# Altium PCB PCB_GTV3.5.PcbDoc (part 9 of 11)
Units mil, origin at the board's own origin, x right, y up, seen from the top; angles counter-clockwise.
Board outline 8070.87 x 4881.89 mil, 4 copper layers (Top Layer, GND, PWR, Bottom Layer), stack 61.653 mil thick; 490 components, 296 nets, 1533 pads, 845 vias.
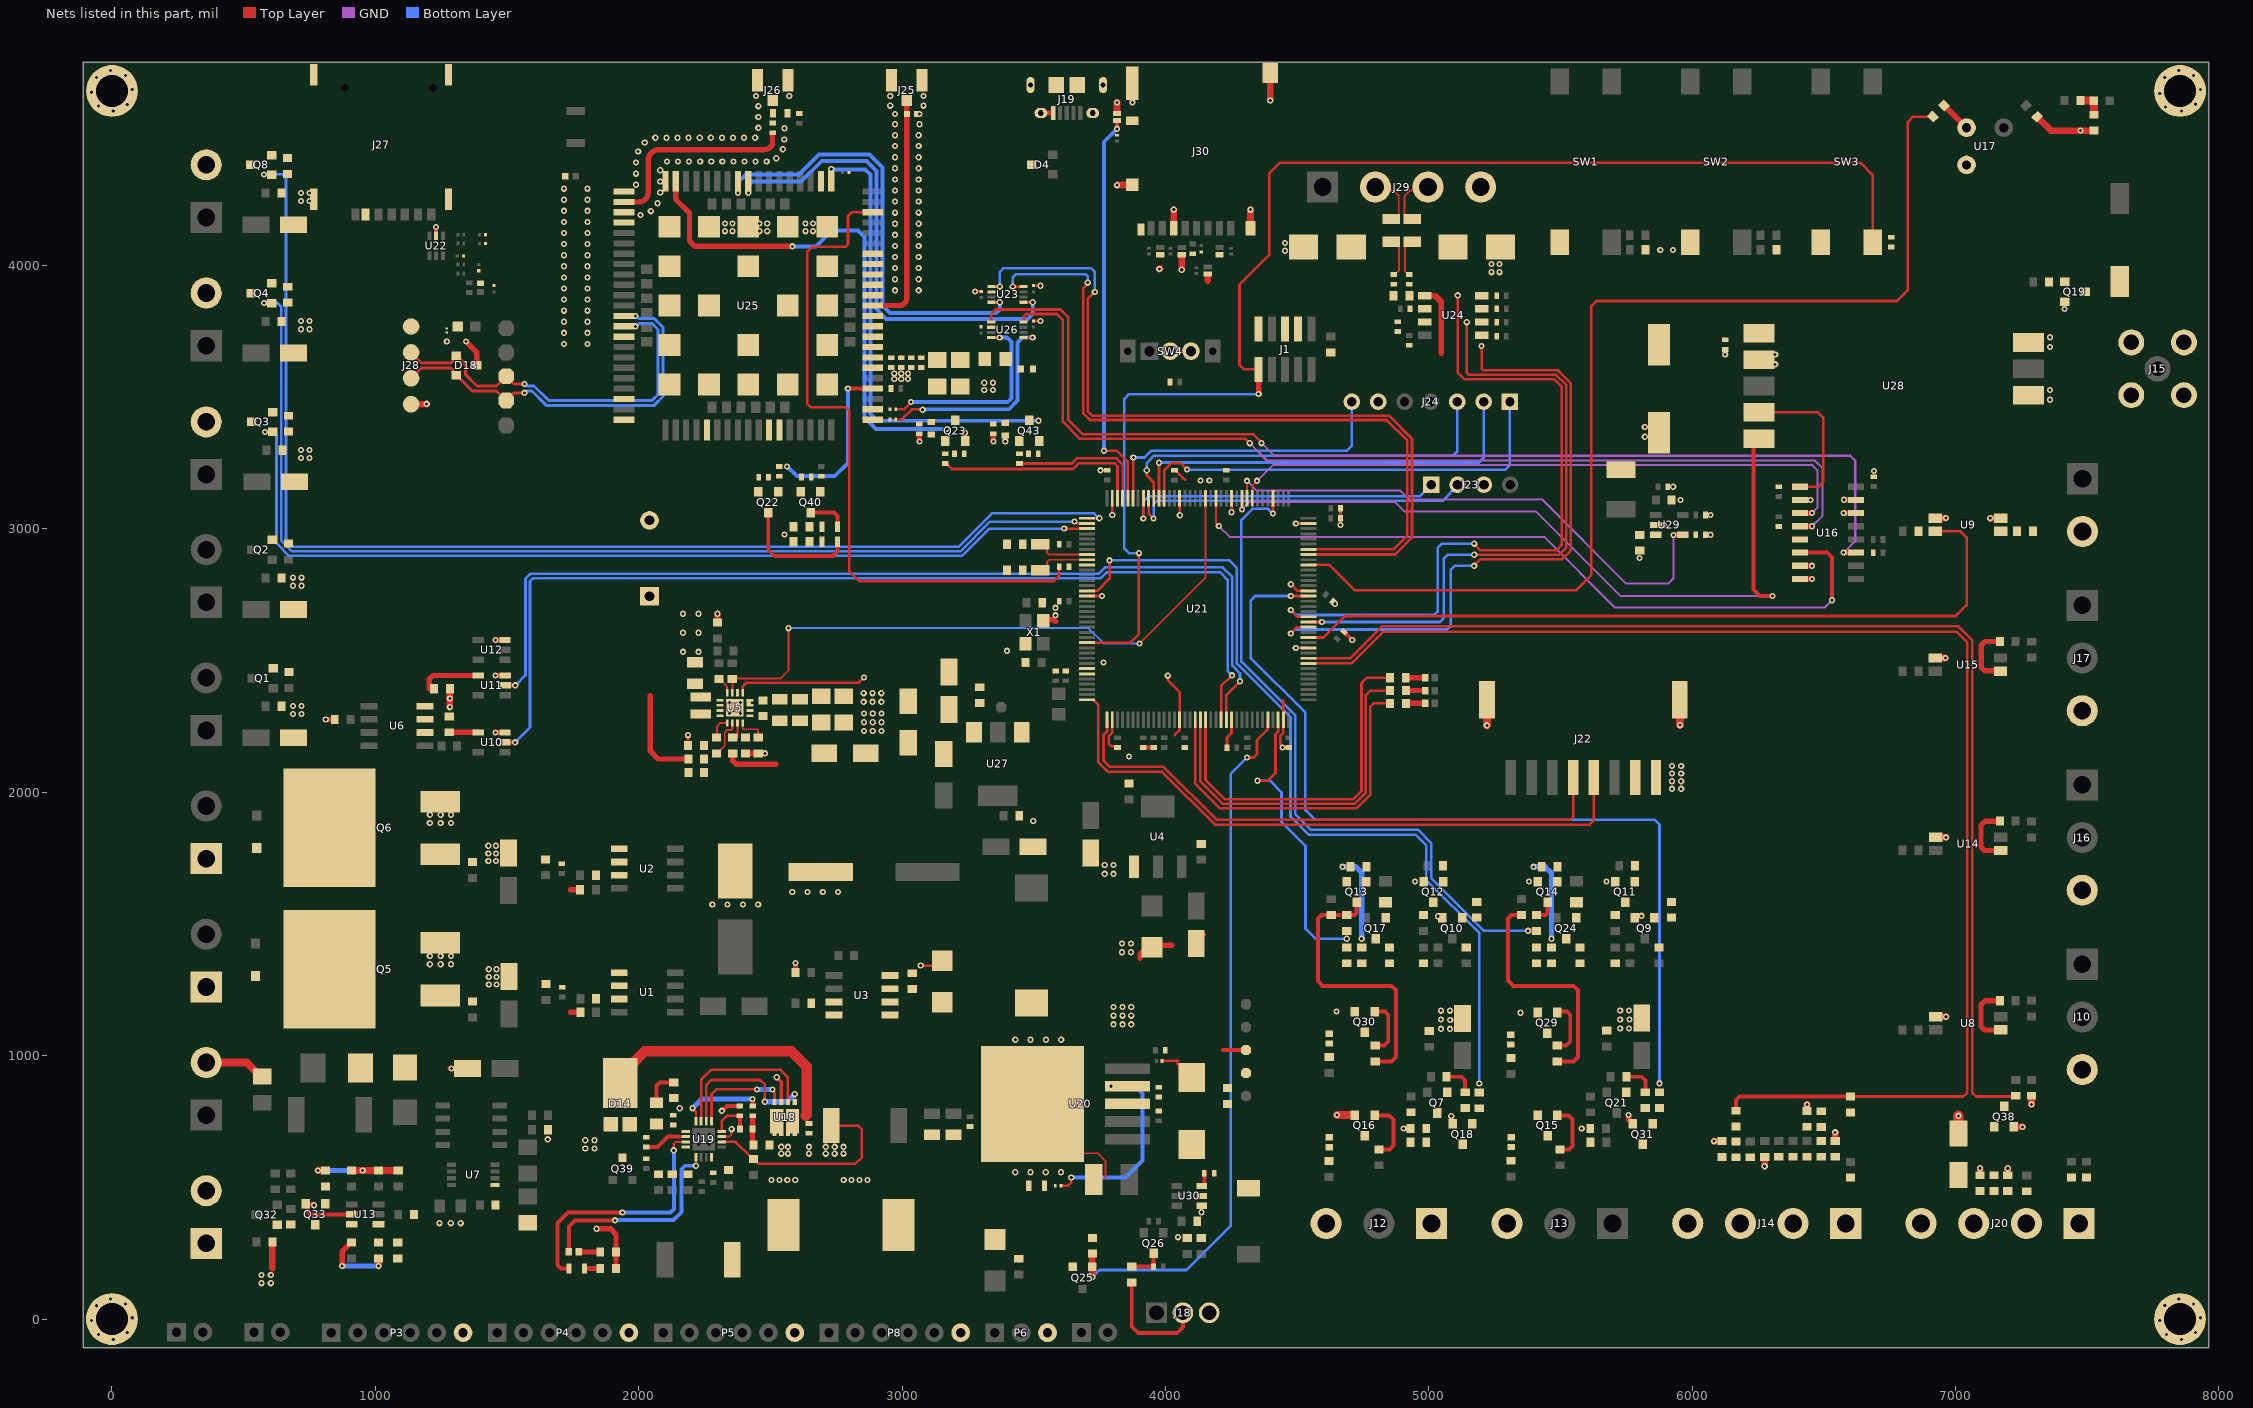
[diagram p6: the nets of this part, all layers, seen from the top]

## Via types
v1: diameter 23.62, hole 11.81, Top Layer to Bottom Layer, tented both sides, 444 vias
v2: diameter 23.62, hole 11.81, Top Layer to Bottom Layer, 401 vias

## Nets (pads, with @x,y where several pads share a name; then routed paths per layer and width w, separated by ;. In a path a pad name is that pad's centre, name@x,y a point inside that pad or via, vN(x,y) a via of type N, cw(c..) or ccw(c..) an arc to the next point about the centre after c; other vN are vias at no path point) (continued)
GATE_DRV.INA_1: U10.2 U21.59 | length 3903.6
  Top Layer w10: U21.59@4211.45,2275.56 4211.45,2402.99 v1(4252.67,2444.21)
  Top Layer w15: U10.2@1492.46,2189.85 v2(1530.87,2189.85)
  Bottom Layer w10: v2@1531.02,2189.74 1587.15,2245.87 1587.15,2801.51 1597.79,2812.15 3754,2812.15 3777.85,2836 4206.4,2836 4235.95,2806.45 4235.95,2460.93 v1(4252.67,2444.21)
GATE_DRV.INB_1: U11.2 U21.60 | length 3751.2
  Top Layer w10: U21.60@4231.14,2275.56 4231.14,2369.29 v1@4283.01,2421.16
  Top Layer w15: U11.2@1492.87,2406.21 v2(1531.28,2406.21)
  Bottom Layer w10: v2@1531.43,2406.09 1570.15,2444.82 1570.15,2811.38 1588.22,2829.44 3745.84,2829.44 3770.4,2854 4217.39,2854 4253.95,2817.45 4253.95,2480.85 4283.01,2451.79 v1(4283.01,2421.64)
GND: C1.2 C2.1 C3.2 C4.2 C5.1 C6.2 C7.2 C8.1 C9.2 C10.2 C11.2 C12.2 C13.1 C14.1 C15.1 C16.2 C17.2 C18.2 C19.2 C20.1 C21.2 C22.2 C23.2 C24.2 C25.2 C26.2 C27.2 C28.1 C29.2 C30.2 C31.2 C32.2 C33.2 C34.1 C35.1 C36.2 C37.1 C38.1 C39.2 C40.2 C41.1 C42.2 C43.2 C44.1 C45.2 C46.2 C47.2 C48.2 C49.2 C50.2 C51.2 C52.2 C53.1 C54.2 C55.2 C57.1 C58.2 C59.2 C60.1 C61.2 C62.2 C63.2 C64.2 C65.2 C66.2 C67.2 C68.2 C69.2 C70.2 C71.1 C72.1 C73.1 C74.1 C76.2 C77.1 C78.1 C79.1 C80.2 C81.1 C83.1 C84.1 C85.1 C88.1 C89.2 C90.1 C91.2 C92.1 C93.2 C94.2 C95.2 C97.1 C98.1 C99.1 C100.1 C101.2 C102.1 C103.2 C104.2 C105.2 C106.2 C107.1 C108.1 C109.2 C110.2 C111.2 C112.2 C113.2 C114.2 C122.1 C123.1 C124.2 C125.1 C126.2 C127.1 C128.1 C129.1 D1.2 D2.2 D3.1 D4.3 D5.1 D8.1 D9.1 D10.1 D12.2 D13.1 D16.2 D17.1 D18.3 D19.2 D20.1 D21.1 D22.1 D23.1 D24.1 D27.1 D30.2 J1.3 J1.5 J1.9 J2.2 J10.3 J12.3 J13.3 J14.3 J14.4 J15.2 J15.3 J15.4 J15.5 J16.3 J17.3 J18.3 J19.5 J19.MH1 J19.MH2 J19.MH3 J19.MH4 J19.MP1 J19.MP2 J20.4 J21.2 J22.1 J22.2 J22.MP1 J22.MP2 J23.3 J24.6 J25.2 J25.3 J26.2 J26.3 J27.1 J27.2 J27.3 J27.4 J27.C5 J28.4 J29.4 J30.6 J30.S1 J30.S2 J30.S3 J30.S4 J30.SW-B LED11.2 NT1.2 P3.6 P4.6 P5.6 P6.3 P8.6 P10.1 pad.MH1 Q1.2 Q2.2 Q3.2 Q4.2 Q5.2 Q6.2 Q8.2 Q9.2 Q10.2 Q11.2 Q12.2 Q13.2 Q14.2 Q15.2 Q16.2 Q18.2 Q19.2 Q22.2 Q23.2 Q25.2 Q29.2 Q30.2 Q31.2 Q33.2 Q38.2 Q40.2 Q43.2 R2.1 R4.2 R6.2 R7.2 R9.2 R10.2 R13.2 R26.2 R32.2 R34.2 R53.1 R54.1 R61.2 R65.1 R66.1 R67.2 R69.2 R70.2 R72.2 R83.2 R84.2 R86.1 R88.1 R91.1 R92.1 R97.2 R98.2 R103.2 R113.1 R131.1 R133.1 R139.1 R142.1 R147.1 R148.2 R155.1 R165.1 R166.1 R167.1 R170.1 SW1.1 SW2.1 SW3.1 SW4.3 U1.5 U1.6 U2.5 U2.6 U3.4 U4.1 U5.17 U6.3 U8.3 U9.2 U9.3 U10.3 U11.3 U12.3 U13.2 U14.3 U15.3 U16.2 U16.5 U16.7 U16.8 U16.14 U16.15 U17.3 U18.3 U19.11 U20.3 U20.6 U21.16 U21.30 U21.31 U21.38 U21.51 U21.61 U21.71 U21.83 U21.94 U21.107 U21.120 U21.130 U21.143 U22.2 U23.2 U24.5 U25.2 U25.17 U25.18 U25.29 U25.39 U25.45 U25.46 U25.54 U25.58 U25.59 U25.61 U25.62 U25.63 U25.64 U25.65 U25.69 U25.70 U25.71 U25.72 U25.73 U25.74 U25.75 U25.76 U25.77 U25.78 U25.79 U25.80 U25.81 U25.82 U25.83 U25.84 U25.85 U25.86 U25.87 U25.88 U25.89 U25.91 U25.92 U25.94 U26.2 U27.1 U28.2 U28.7 U28.8 U29.2 U30.4 X1.2 X1.4 | length 6088
  Top Layer w7: U20.6@3495.55,817.03 3683.05,629.53 3742.84,629.53 3773.26,599.11 3773.26,598.16 3772.8,597.7 3772.8,534.16
  Top Layer w8: U19.11@2315.54,692.67 2343.2,692.67 2352.87,702.34 v2(2352.87,721.03)
  Top Layer w10: J28.4@1135.6,3473.34 J28.4@1136.43,3474.17 ; v1@1194.17,3474.17 v1(1195,3475) ; U10.3@1492.46,2227.25 U10.3@1492.87,2227.66 ; U12.3@1492.46,2578.46 U12.3@1492.95,2578.95 ; U11.3@1492.87,2443.61 U11.3@1492.95,2443.68 ; C4.2@1505.16,1298.03 C4.2@1507.5,1300.37 ; C122.1@2187.33,2178 v2(2187.33,2216.99) ; U5.17@2344.33,2345.13 2344.33,2341.53 U5.17@2365.33,2320.53 ; C80.2@2383.71,808.69 C80.2@2383.87,808.53 ; C16.2@2594.98,1667.95 2624.43,1697.4 C16.2@2691.42,1697.4 ; v2(3070.87,1342.03) 3134.13,1342.03 D1.2@3152.87,1360.77 ; v1(3276.82,3901.99) C103.2@3300.41,3901.99 ; C106.2@3499,3789.81 3499.34,3789.47 3525.38,3789.47 v1(3525.72,3789.13) ; C104.2@3499,3923.81 v1@3525.03,3923.81 ; X1.4@3535.62,2650.61 X1.4@3537.32,2652.31 ; U21.16@3702.4,2745.25 v1(3759.39,2745.25) ; v1(3753.18,3222.5) C110.2@3778.38,3222.5 ; U21.38@3798.06,2275.56 3798.06,2226.29 3784.85,2213.07 3784.85,2184.03 3794.38,2174.5 3813.75,2174.5 C30.2@3817.75,2170.5 ; v1(3798.06,3053.42) U21.143@3798.06,3116.51 ; v1(4009.09,2442.9) 4009.17,2442.83 4009.17,2425.07 4053.97,2380.26 U21.51@4053.97,2275.56 4053.97,2236.81 4034.95,2217.79 ; J30.6@4031.27,4141 J30.6@4031.54,4140.73 ; C109.2@4034.28,3222.5 4038.28,3218.5 4042.61,3218.5 4074.63,3186.48 ; U21.130@4053.97,3116.51 4054.25,3116.23 4054.25,3052.41 v1(4054.53,3052.13) ; C29.2@4070.16,2170.5 C29.2@4073.66,2170.5 ; C95.2@4227.64,3222.5 C95.2@4231.14,3222.5 ; C12.2@4233.51,2169.01 4233.51,2207.34 4250.82,2224.66 U21.61@4250.82,2275.56 ; U21.120@4250.82,3116.51 4251.1,3116.23 v1(4251.1,3063.4) ; v1(4444.4,2170.5) 4444.4,2174.19 4436.04,2182.55 4436.04,2214.65 4447.67,2226.29 U21.71@4447.67,2275.56 4447.67,2349.65 ; v1(4476,2790.13) 4501.2,2764.93 U21.94@4543.34,2764.93 ; v1(4495,3020.84) U21.107@4543.34,3020.84 ; v1(4495.05,2548.4) U21.83@4543.34,2548.4 ; C33.2@4635.03,2724.72 C33.2@4635.03,2724.82 ; v1(4664.5,3015.33) C93.2@4664.5,3040.52 C112.2@4664.5,3079 ; C32.2@4677.63,2609.36 C32.2@4677.97,2609.36 ; Q16.2@4719.36,774.29 Q16.2@4719.47,774.4 ; C59.2@5001.64,1094.03 C59.2@5001.87,1094.26 ; J22.MP2@5220.24,2350.68 J22.MP2@5220.88,2351.31 ; D8.1@5248.34,4046.42 D8.1@5272.47,4070.55 ; SW1.1@5517,4088.44 SW1.1@5518.87,4086.57 ; C45.2@5674.87,1096.03 C45.2@5675.87,1095.03 ; SW3.1@6489.55,4088.44 SW3.1@6489.87,4088.12 ; D12.2@7010.76,704.89 D12.2@7010.87,704.77 ; C40.2@7092.99,546.03 C40.2@7092.99,546.03 ; R66.1@7197.88,546.15 R66.1@7197.99,546.03 ; Q38.2@7221.27,729.66 Q38.2@7221.38,729.78
  Top Layer w15: Q33.2@742.89,435.03 Q33.2@737.21,435.03 ; Q33.2@742.89,436.86 Q33.2@748.42,436.86 ; Q33.2@750.25,435.03 752.22,437 v2@766.67,437 ; U13.2@909.82,397.63 750.52,397.63 741.23,406.92 741.23,431.01 Q33.2@737.21,435.03 ; U22.2@1230.87,4113.22 v2(1230.87,4146.03) ; v2(2315.54,790.67) 2317.88,790.67 2335.74,808.53 2378.87,808.53 2379.03,808.69 C80.2@2383.71,808.69 ; v2(2524,918) 2541.16,900.84 U18.3@2541.16,824.67 ; C30.2@3817.75,2170.5 3819.25,2169 C30.2@3822.75,2169 ; v1@3860.35,2135.31 3862,2133.66 v1@3863.65,2135.31 ; C36.2@3912.67,2170.5 C36.2@3916.17,2170.5 R13.2@3955.54,2170.5 ; C21.2@4114.81,1399.48 4114.81,1428.16 C21.2@4146.68,1460.03 ; C33.2@4635.03,2724.72 4635.14,2724.72 v1(4643.87,2715.98) ; C32.2@4677.97,2609.36 4677.97,2609.16 4709.12,2578.01 v1(4709.25,2578.01) ; Q33.2@737.21,435.03 735.24,435.03 Q33.2@735.24,437 Q33.2@737.21,435.03
  Top Layer w20: v2(811.87,2276.03) C55.2@845.87,2276.03 ; v2@1283.91,951.4 v2(1288.91,951.4) C1.2@1350.25,951.4 ; v1(1344.37,3711.4) 1385.37,3670.39 D18.3@1385.37,3621 ; v2@1456.35,2227.18 U10.3@1492.39,2227.18 ; v2@1456.35,2578.39 U12.3@1492.39,2578.39 ; v2@1456.76,2443.53 U11.3@1492.8,2443.53 ; U12.3@1491.56,2580.27 1492.89,2578.95 U12.3@1492.95,2578.95 ; 1740.87,1630.29 C18.2@1777.5,1630.29 ; 1741.87,1165.29 C6.2@1778.5,1165.29 ; R2.1@2594.98,1315.4 v1(2594.98,1352.03) ; v1(3065.6,3332.27) C97.1@3065.6,3356.75 ; Q23.2@3239,3347.34 v1(3239,3365.2) ; v1(3346.6,3332.27) C102.1@3346.6,3356.75 ; v1(3391.54,3332.27) D19.2@3391.54,3350.13 ; J19.MH2@3526.96,4579.07 J19.5@3565.94,4579.07 ; X1.4@3537.32,2656.31 3572.56,2656.31 3580.46,2648.41 3582.78,2648.41 3583,2648.62 ; 3903.48,1370.11 3903.48,1386.35 3916.86,1399.73 3933.1,1399.73 3933.1,1406.03 3946.47,1419.41 4023.83,1419.41 ; v2(5085.18,770.31) 5085.88,769.61 5085.88,749.84 5090.47,745.25 Q18.2@5090.47,741.73 ; v2(5758.32,774.38) 5759.02,773.69 5759.02,759.14 5774.47,743.7 Q31.2@5774.47,741.73 ; U16.8@6408.7,2810 v1(6455,2810) ; U16.7@6408.7,2860 v1(6455,2860) ; U16.2@6408.7,3110 v1(6449.19,3110) ; v1(6575,3060) U16.14@6621.3,3060 ; v1(6576.47,3110.62) U16.15@6622.77,3110.62
  Top Layer w22: C123.1@2299.33,2644 v2(2299.33,2678) ; R165.1@2405.49,2147.99 v2(2479.7,2147.98) ; U24.5@4985.78,3884.35 U24.5@4984.62,3885.51 5024.34,3885.51 5046.87,3862.99 5046.87,3668.53
  Top Layer w25: R34.2@608.87,293.03 609.03,292.87 609.03,193.03 ; J28.4@1136.43,3474.17 v1@1194.17,3474.17 ; v2@1282.87,2327.21 v2(1282.87,2356.12) R84.2@1282.87,2393.03 ; v1(3816,4305.19) 3816.63,4305.81 J30.S2@3874.06,4305.81 ; D24.1@3816,4584.4 v1(3816,4619.29) ; v1@3874.32,4619.56 J30.S3@3874.32,4662.3 ; v1(3976.65,3986.97) v1@3980,3990.32 ; J30.6@4031.27,4141 v1(4031.27,4212.12) ; v1(4061.84,3983.97) D22.1@4061.84,4033.92 ; 4160.84,3942.3 D21.1@4160.84,3960.17 ; J30.S1@4322.88,4141.26 v1(4322.88,4212.12) ; v1(4397.68,4627) 4397.68,4672.74 J30.S4@4397.68,4730.74 ; v2(6082.87,675.4) C42.2@6112.87,675.4 ; v2(6275.03,580.03) R103.2@6275.03,615.4 ; C79.1@6435.87,790.03 v2(6435.87,815.03) ; R113.1@6542.76,676.51 v2(6542.76,709.05) ; U15.3@6922.43,2509.75 6922.54,2509.86 v2(6961.06,2509.86) ; U9.3@6923.21,3040.92 6923.32,3041.03 v2(6962.87,3041.03) ; U8.3@6924.21,1147.92 6924.32,1148.03 v2(6963.87,1148.03) ; U14.3@6924.21,1828.92 6924.32,1829.03 v2(6963.87,1829.03) ; C40.2@7092.99,546.03 v2(7092.95,572.76) ; v2(7131.59,3040.81) 7171.13,3040.81 U9.2@7171.25,3040.92 ; R66.1@7197.88,546.15 v2(7197.88,572.76) ; Q38.2@7221.38,729.78 v2(7253.92,729.78) ; v2(7288.34,815.38) C39.2@7288.34,847.92 ; C76.2@7309.39,4565.16 7362.02,4512.53 v1(7473.87,4512.53) R53.1@7525.38,4512.53
  Top Layer w30: J2.2@357.92,974.12 511.35,974.12 544.98,940.49 C2.1@544.98,939.51 ; v2(4650.87,774.4) 4719.24,774.4 Q16.2@4719.36,774.29 ; v1(5220.24,2254.36) J22.MP2@5220.24,2350.68 ; v1(5953.16,2254.99) J22.MP1@5953.16,2351.31
  Top Layer w40: D12.2@7010.76,704.89 v2(7010.76,771.69)
  Top Layer w50: P4.6@1961.87,-50.43 P4.6@1962.87,-51.43 ; P5.6@2592.62,-51.43 P5.6@2593.87,-50.18 ; P8.6@3222.37,-51.43 P8.6@3222.87,-50.93 ; P6.3@3551.87,-51.18 P6.3@3552.12,-51.43
  Bottom Layer w70: P6.3@3552.12,-51.43 P6.3@3552.29,-51.27
  other v1: 5045.87,1101.9 5079.87,1101.9 5726.37,1102.9 5760.37,1102.9 5045.87,1136.9 5726.37,1137.9 5045.87,1170.9 5079.87,1170.9 5726.37,1171.9 5760.37,1171.9 1207,1346.99 1248,1346.99 1287,1346.99 1207,1378.99 1248,1378.99 1287,1378.99 1207,1883 1248,1883 1287,1883 1207,1915 1248,1915 1287,1915 3862,2135.66 687.87,2297.07 720,2297.07 687.87,2328 720,2328 3765,2493 687.87,2784.11 720,2784.11 687.87,2815.03 720,2815.03 5800,2890 6069.1,2978.04 5892.75,3015.45 6069.1,3052.85 5955.75,3109.38 5927.75,3160 4132.71,3183.5 4166.57,3183.5 6690,3220 717.87,3269.11 750,3269.11 717.87,3300.03 750,3300.03 5820,3350 5820,3387.5 7358.31,3490.35 7358.31,3527.85 2970.31,3569.63 2996.8,3569.63 3022.8,3569.63 2970.31,3590.25 2996.8,3590.25 3022.8,3590.25 6315,3625 6125,3662.5 6315,3662.5 7358.31,3690.35 1715.89,3702.37 1805.85,3702.37 7358.31,3727.85 1715.89,3744.48 1805.85,3744.48 717.87,3758.07 750,3758.07 1715.89,3786.59 1805.85,3786.59 717.87,3789 750,3789 1715.89,3828.7 1805.85,3828.7 7413.69,3835 1715.89,3870.82 1805.85,3870.82 2973,3906 3063,3906 1715.89,3912.93 1805.85,3912.93 3525.38,3923.47 2973,3948.11 3063,3948.11 1715.89,3955.04 1805.85,3955.04 2973,3990.23 3063,3990.23 1715.89,3997.16 1805.85,3997.16 2973,4032.34 3063,4032.34 1715.89,4039.27 1805.85,4039.27 5879,4059 5927,4059 2973,4074.45 3063,4074.45 1715.89,4081.38 1805.85,4081.38 2973,4116.57 3063,4116.57 1715.89,4123.5 1805.85,4123.5 2973,4158.68 3063,4158.68 1715.89,4165.61 1805.85,4165.61 2007.04,4191.51 2973,4200.79 3063,4200.79 2046.08,4206.47 1715.89,4207.72 1805.85,4207.72 2071.23,4236.51 2973,4242.91 3063,4242.91 717.87,4245.07 750,4245.07 1715.89,4249.84 1805.85,4249.84 717.87,4276 750,4276 2081.74,4277.51 2973,4285.02 3063,4285.02 1715.89,4291.95 1805.85,4291.95 1990,4306.77 2081.74,4319.63 2973,4327.13 3063,4327.13 1990,4348.89 2081.74,4361.74 2973,4369.25 3063,4369.25 1990,4391 2106.91,4395.15 2149.03,4395.15 2191.14,4395.15 2233.25,4395.15 2275.37,4395.15 2317.48,4395.15 2359.59,4395.15 2401.71,4395.15 2443.82,4395.15 2485.93,4395.15 2522.07,4407.56 2973,4411.36 3063,4411.36 1998,4433.11 2547.22,4441.6 2973,4453.47 3063,4453.47 2023.15,4467.15 2552.67,4479.03 2063.19,4485.11 2105.3,4485.11 2147.41,4485.11 2189.53,4485.11 2231.64,4485.11 2273.75,4485.11 2315.87,4485.11 2357.98,4485.11 2400.09,4485.11 2442.21,4485.11 2973,4494.58 3063,4494.58 2553.67,4521.14 2454.11,4523 2973,4536.7 3066,4536.7 2454.11,4564.11 2973,4575 3066,4575 2454.11,4605.23 2954.91,4607.11 3081.05,4607.11 3874.59,4619.29 2445.45,4644.09 2571.59,4644.09 2954.91,4644.09 3081.05,4644.09
  other v2: 5,-77.16 7857.27,-77.1 -50.91,-58.15 7801.36,-58.09 57.98,-51.08 7910.25,-51.01 -77,-5.16 7775.27,-5.1 77,4.84 7929.27,4.9 -57.98,50.75 7794.29,50.81 50.91,57.82 7903.18,57.88 -5,76.84 7847.27,76.9 568.2,136.36 603.2,136.36 568.2,167.36 603.2,167.36 4047.67,311 1243.98,364.16 1286.39,364.16 1323.98,364.16 4137.05,405.52 766.67,432 3429.52,557.6 3487.52,557.6 3545.52,557.6 3603.52,557.6 2646.47,628 2646.47,654 1654.87,682.4 4904.52,723.51 5580.21,723.51 2155.89,800.39 3429.97,1060.42 3487.97,1060.42 3545.97,1060.42 3603.97,1060.42 5080.87,1135.9 5761.37,1136.9 5348,1163 4649.2,1167.51 1430.95,1270.14 1459.79,1270.14 1430.95,1299.07 1459.79,1299.07 1430.95,1328 1459.79,1328 3835.37,1392.58 3868.87,1392.58 3835.37,1425.58 3868.87,1425.58 5035.03,1529.4 5807.7,1531.06 2279.58,1573.6 2337.58,1573.6 2395.58,1573.6 2453.58,1573.6 2583,1622 2641,1622 2699,1622 2757,1622 4947.18,1661.06 5380.55,1661.06 5674.81,1661.06 3769.62,1690.56 3803.12,1690.56 3769.62,1723.56 3803.12,1723.56 1429,1739.14 1457.83,1739.14 1429,1768.07 1457.83,1768.07 1429,1797 1457.83,1797 3497.87,1891 5923.17,2013.18 5958,2013.18 5923.17,2042.11 5958,2042.11 5923.17,2071.03 5958,2071.03 5923.17,2099.96 5958,2099.96 1456.28,2227.1 2344.72,2299.53 2385.93,2299.53 1282.87,2323.21 2344.33,2341.13 2385.93,2341.53 1456.69,2443.46 3398.84,2537.19 1456.28,2578.32 3583,2672.02 3583,2700.37 1271.6,3711.4 5237.87,3974.83 5267.87,3974.83 5237.87,4006.03 5267.87,4006.03 4454.07,4056.03 4454.07,4086.03 2327.52,4130.49 2356.36,4130.49 2459.13,4130.49 2487.96,4130.49 2632.77,4130.49 2661.6,4130.49 2327.52,4159.42 2356.36,4159.42 2459.13,4159.42 2487.96,4159.42 2632.77,4159.42 2661.6,4159.42 4.94,4586.13 7857.21,4586.19 7797.3,4602.21 -50.97,4605.15 57.92,4612.22 7910.19,4612.28 7775.24,4653.79 -77.06,4658.13 76.94,4668.13 7929.21,4668.19 -58.04,4714.04 7794.23,4714.1 50.85,4721.11 7903.12,4721.17 -5.06,4740.13 7847.21,4740.19
GND_DRV_1: D25.1 J3.1 Q5.3
GND_DRV_2: D26.1 J4.1 Q6.3
GNSS_ANT: C96.2 J26.1 L6.2 | length 0
GNSS_MCU_RX: R169.1 U16.4 U26.8 | length 3809.8
  Top Layer w10: U26.8@3460.89,3785.56 3460.89,3786.05 3461.3,3786.47 3461.3,3806.47 3470.78,3815.94 3587.29,3815.94 3610.09,3793.15 3610.09,3408.07 3675.78,3342.39 4303.18,3342.39 v2(4320,3325.57)
  Top Layer w20: U16.4@6408.7,3010 v1(6455,3010)
  GND w8: v2(4320,3325.57) 4385.57,3260 6465,3260 6495,3230 6495,3050 v1(6455,3010)
GNSS_MCU_TX: R104.1 U16.11 U26.1 | length 4198.2
  Top Layer w10: U26.1@3338.84,3785.56 3338.84,3815.53 3356.26,3832.94 3601.68,3832.94 3631.58,3803.04 3631.58,3413.87 3686.06,3359.39 4333.75,3359.39 4365,3328.14 v2(4365,3325.57)
  Top Layer w20: v1(6575,2910) U16.11@6621.3,2910
  GND w8: v2(4365,3325.57) 4412.57,3278 6600.25,3278 6619.03,3259.23 6619.03,2954.03 v1(6575,2910)
GNSS_PWRCTRL: R134.2 U21.10
GNSS_RXD: R135.2 U26.4 | length 754.3
  Top Layer w10: R135.2@2975.69,3454.33 3007.45,3454.33 3033.84,3480.72 v1(3033.84,3481.89) ; U26.4@3338.84,3726.51 v1(3370.59,3726.51)
  Bottom Layer w15: v1(3033.84,3481.89) 3401.22,3481.89 3415.29,3495.97 3415.29,3709.15 3397.93,3726.51 v1(3370.59,3726.51)
GNSS_TXD: R140.2 U26.5 | length 814.4
  Top Layer w10: R140.2@2975.69,3414.96 2997.56,3414.96 3036.93,3454.33 3076.35,3454.33 v1(3078.1,3452.58) ; U26.5@3460.89,3726.51 v1(3495.78,3726.51)
  Bottom Layer w15: v1(3078.1,3452.58) 3079.75,3454.23 3085.84,3454.23 3085.95,3454.33 3405.29,3454.33 3438.76,3487.8 3438.76,3707.96 3457.31,3726.51 v1(3495.78,3726.51)
GSM_PWR: C88.2 C89.1 C117.2 C118.2 C119.2 C120.2 C121.2 D10.2 D29.2 FB1.2 P9.1 R109.2 R130.2 R131.2 R132.2 R137.2 R145.2 U5.1 U5.2 U5.13 U5.14 U20.4 | length 1784.5
  Top Layer w10: U5.1@2394.86,2377.61 2394.86,2402.06 2408.8,2416 2834.66,2416 v2(2855,2436.34) ; R132.2@3603.52,506.31 3630.45,506.31 3642.31,518.17 v2(3642.31,537.28) ; R130.2@3987.06,980.16 4047.74,980.16 ; 4045.1,970.16 4054.14,961.12 4054.14,919.75 4060.71,913.18 4060.71,899.03 4069.9,889.85 4084.04,889.85 4099.73,874.16 4099.73,878.49 C89.1@4145.32,924.08
  Top Layer w15: 4218.87,1021.36 P9.1@4305.75,1021.36
  Top Layer w20: R109.2@2357.41,2148 2357.41,2118.72 2369.12,2107 2521,2107
  Bottom Layer w15: v2(3642.31,537.28) 3847.65,537.28 3912.57,602.2 3912.57,855.57 3884.19,883.96 v2(3793,883.96)
  other v1: 3312,3528 3345,3528 3312,3555 3345,3555
  other v2: 3803,1119 3836.5,1119 3870,1119 3803,1152 3836.5,1152 3870,1152 3803,1185 3836.5,1185 3870,1185 2855,2233 2888.5,2233 2922,2233 2855,2266 2888.5,2266 2922,2266 2855,2299 2888.5,2299 2922,2299 2554,2979
GSM_PWR_EN: R146.2 U21.141 | length 538.3
  Top Layer w10: R146.2@3445.65,3248.53 3644.5,3248.53 3664.2,3268.24 3814.69,3268.24 3837.43,3245.49 U21.141@3837.43,3116.51
GSM_RST: R154.1 U21.142 | length 797.6
  Top Layer w10: R154.1@3164.2,3248.53 3167.7,3248.53 3188.7,3227.53 3648.96,3227.53 3670.99,3249.57 3806.07,3249.57 3817.75,3237.89 U21.142@3817.75,3116.51
GSM_RX: U23.4 U25.10 | length 1700.3
  Top Layer w10: U23.4@3339.26,3860.68 v1(3371,3860.68)
  Bottom Layer w15: v1(2376.87,4276.03) 2376.87,4316.38 2406.93,4346.44 2608.84,4346.44 2684.37,4421.97 2877.12,4421.97 2926,4373.09 2926,3847.74 2954.33,3819.42 3356.92,3819.42 3371,3833.5 v1(3371,3860.68)
GSM_TX: U23.5 U25.9 | length 1790.5
  Top Layer w10: U23.5@3461.3,3860.68 v1(3496.19,3860.68)
  Bottom Layer w15: v1(2416.24,4276.03) 2416.24,4304.44 2430.79,4318.99 2616.32,4318.99 2695,4397.67 2864.53,4397.67 2902.4,4359.8 2902.4,3834.43 2939.41,3797.42 3477.34,3797.42 3496.19,3816.27 v1(3496.19,3860.68)
GSM_USB_D_N: D18.1 J28.2 P14.1 U25.28 | length 1449.2
  Top Layer w11: J28.2@1135.6,3670.19 1175.31,3630.48 1235.58,3630.48 ; 1235.6,3630.5 1287.58,3630.5 1294.02,3636.94 1294.02,3647.76 1304.66,3658.4 1308.6,3658.4 1341.63,3625.37 1341.63,3587.41 1385.95,3543.09 1460.56,3543.09 P14.1@1497,3579.53 1497.96,3579.53 1527.09,3550.4 v1(1566,3550.4)
  Bottom Layer w11: v1(1566,3550.4) 1569.42,3550.4 1576.73,3543.09 1602.43,3543.09 1657.19,3488.32 2051.11,3488.32 2073.02,3510.24 2073.02,3757.76 2051.33,3779.46 2001.02,3779.46 1990.83,3769.27 v1(1988.26,3769.27)
GSM_USB_D_P: D18.2 J28.3 P13.1 U25.27 | length 1466.8
  Top Layer w11: J28.3@1135.6,3571.76 1175.31,3611.48 1243.45,3611.48 ; 1243.47,3611.5 1287.58,3611.5 1294.02,3605.06 1294.02,3594.24 1312.43,3575.83 1316.36,3575.83 1368.11,3524.09 1460.56,3524.09 P13.1@1497,3487.64 1497.96,3487.64 1527.09,3516.78 v1(1566,3516.78)
  Bottom Layer w11: v1(1566,3516.78) 1569.42,3516.78 1576.73,3524.09 1594.56,3524.09 1649.32,3469.32 2058.98,3469.32 2092.02,3502.37 2092.02,3765.63 2059.2,3798.46 2001.02,3798.46 1990.83,3808.64 v1(1988.26,3808.64)
HC_PWR: R170.2 U21.117 U29.4 | length 2066.6
  Top Layer w7: v2(4309.62,3182.71) 4309.75,3182.58 4309.75,3116.64 U21.117@4309.88,3116.51
  Top Layer w20: v1(5928.7,2977.38) U29.4@5975,2977.38
  GND w8: v2(4309.62,3182.71) 4346.69,3145.64 4891.79,3145.64 4925.62,3111.81 5430.7,3111.81 5750.15,2792.36 5908.55,2792.36 5928.7,2812.51 v1(5928.7,2977.38)
HEAT_CNTRL: R33.1 U21.93 | length 3458.2
  Top Layer w10: v1(4476,2745.25) U21.93@4543.34,2745.25
  Bottom Layer w10: v1(4476,2745.25) 4340.58,2745.25 4324.16,2728.83 4324.16,2508.86 4530.83,2302.19 4530.83,1932.07 4567.01,1895.89 5857.01,1895.89 5875.87,1877.03 v2(5875.87,895.03)
HEATER: C44.2 J12.1 Q7.3 R26.1 SB2.2 | length 2.1
  Top Layer w25: J12.1@5010.15,363.03 J12.1@5011.64,364.52
HMI_UART.RX_HMI: J22.4 U21.36 | length 2393.5
  Top Layer w10: U21.36@3726.65,2350.75 3745.37,2332.03 3745.37,2113.63 3781,2078 3986.92,2078 4187.96,1876.96 5610.16,1876.96 5626.39,1893.19 J22.4@5626.39,2056.03
HMI_UART.TX_HMI: J22.5 U21.37 | length 2190.4
  Top Layer w10: U21.37@3778.38,2275.56 3778.38,2230.64 3764.73,2216.99 3764.73,2121.19 3788.88,2097.03 3991.93,2097.03 4192.97,1896 5537.72,1896 5547.65,1905.93 J22.5@5547.65,2056.03
I2C_ENCODER.SCL: J23.2 U21.136 | length 1325.6
  Top Layer w10: U21.136@3935.86,3116.51 3935.86,3059.17 v1(3955.03,3040)
  Bottom Layer w10: v1(3955.03,3040) 3955.03,3094.85 3967,3106.82 5051.33,3106.82 5108.87,3164.36 J23.2@5108.87,3168.03
I2C_ENCODER.SDA: J23.1 U21.137 | length 1260.1
  Top Layer w10: v1(3916,3040) 3916.09,3040.09 3916.09,3116.42 U21.137@3916.17,3116.51
  Bottom Layer w10: v1(3916,3040) 3916,3104.26 3935.55,3123.82 4964.65,3123.82 J23.1@5008.87,3168.03
I34_MicroSD_DET: D24.2 J30.SW-A R160.1 U21.140 | length 1519
  Top Layer w10: v1(3767,3297) 3814.18,3297 3857.12,3254.06 U21.140@3857.12,3116.51
  Top Layer w15: v1(3816,4519) D24.2@3816,4550.22
  Bottom Layer w15: v1(3767,3297) 3767,4470 v1(3816,4519)
IN+: R11.1 R30.2 U13.3 | length 269.8
  Top Layer w10: R30.2@1012.14,230.46 R30.2@1012.14,230.46
  Top Layer w20: v2@874.04,203.46 874.04,257.18 902.32,285.46 904.82,285.46 R11.1@909.82,290.46
  Top Layer w25: v2(1012.18,201.16) R30.2@1012.14,230.46
  Bottom Layer w20: v2(874.04,201.16) v2@1011.2,201.16
IN-: R30.1 R32.1 U13.4
INA_1#: R83.1 U6.2 U10.4 | length 109.3
  Top Layer w20: R83.1@1280.8,2227.89 U10.4@1390.1,2227.89
INB_1#: R84.1 U6.4 U11.4 | length 228
  Top Layer w20: 1204.87,2393.03 1204.87,2429.66 1218.81,2443.61 U11.4@1390.51,2443.61
IND1: LED5.2 Q16.3
IND2: LED4.2 Q15.3
IND3: LED6.2 Q29.3
IND4: LED7.2 Q30.3
INH: U16.6 U21.123 | length 2870.3
  Top Layer w7: U21.123@4191.77,3116.51 4191.77,3023.16 4202.62,3012.3 v2(4202.62,3010.75)
  Top Layer w15: U16.6@6408.7,2910 6512.66,2910 6530.32,2892.34 6530.32,2730 v2(6530.91,2729.41)
  GND w8: v2(4202.62,3010.75) 4243.56,2969.81 5438.13,2969.81 5706.39,2701.55 6503.05,2701.55 v2(6530.91,2729.41)
IO_A11: R15.1 U21.55 | length 1384.9
  Top Layer w10: U21.55@4132.71,2275.56 4132.71,2041.84 4196.55,1978 4218.57,1955.98 4677.52,1955.98 4718.4,1955.98 4761.1,1998.67 4761.1,2039.56 4761.1,2053.14 4761.1,2369.48 4777.88,2386.27 R15.1@4852.86,2386.27
IO_A12: R17.1 U21.54 | length 1381.2
  Top Layer w10: U21.54@4113.03,2275.56 4113.03,2033.74 4207.78,1938.98 4684.56,1938.98 4725.45,1938.98 4778.1,1991.63 4778.1,2032.52 4778.1,2324.9 4790.7,2337.5 R17.1@4852.86,2337.5
IO_C9: R28.1 U21.15 | length 3246.7
  Top Layer w10: U21.15@3702.4,2764.93 3741.16,2764.93 3788,2811.77 v1(3788,2880.81)
  Bottom Layer w10: v1(3788,2880.81) 4242.63,2880.81 4271.16,2852.27 4271.16,2489.06 4474.82,2285.4 4474.82,1907.48 4543.4,1838.89 4950.12,1838.89 4989.87,1799.14 4989.87,1667.03 5191.41,1465.49 v2(5191.41,894.03)
IO_C13: R14.1 U21.56 | length 1390.7
  Top Layer w10: U21.56@4152.14,2275.56 4152.14,2046.45 4225.61,1972.98 4711.36,1972.98 4744.1,2005.72 4744.1,2414.62 4764.52,2435.03 R14.1@4852.36,2435.03
"IPK SNS": R3.1 U3.1 U3.7 U3.8
IRQ_NFC: J24.7 U21.139 | length 1170.4
  Top Layer w10: U21.139@3876.8,3116.51 3877.32,3117.02 3877.32,3270.32 v1(3878,3271)
  Bottom Layer w10: v1(3878,3271) 3920,3271 3946.21,3297.21 4688.79,3297.21 4707.87,3316.29 J24.7@4707.87,3483.03
LED_DIN: J18.2 R75.2 | length 436.2
  Top Layer w15: R75.2@3872,139 3872,-28.5 3897.25,-53.74 4043.01,-53.74 4066,-30.75 J18.2@4066,24
LED_SIG.W_LED_CNTRL: Q25.1 R72.1 U21.68 | length 2715.8
  Top Layer w10: 3722.51,223.34 3721.23,224.61 3721.23,247.01 R72.1@3722.51,248.28 ; v1(4309.08,2132) 4334.58,2132 4347.36,2144.78 4347.36,2198.17 4388.1,2238.92 4388.1,2275.05 U21.68@4388.62,2275.56
  Top Layer w25: R72.1@3720.31,247.93 R72.1@3722.52,245.73 ; v2(3722.52,159.32) Q25.1@3722.51,199.14 R72.1@3722.52,245.73 ; R72.1@3722.52,245.78 R72.1@3722.52,245.73
  Bottom Layer w10: v2(3722.52,159.32) 3749.47,186.28 4079.19,186.28 4248.27,355.36 4248.27,2071.03 4309.08,2131.83 v1(4309.08,2132)
LEVEL_IN: J11.2 R80.2
LEVEL_MCU: R79.1 U9.4 U21.85 | length 2934.5
  Top Layer w10: U21.85@4543.34,2587.77 4600.51,2587.77 4681.93,2669.18 4729.2,2669.18 6999.98,2669.18 7041.85,2711.06 7041.85,2967.79 7018.71,2990.92 U9.4@6923.21,2990.92
MCU_RX: U21.102 U23.8 | length 2926.1
  Top Layer w10: v1(3420.1,3919.74) U23.8@3461.3,3919.74 ; v1(3705,3935) 3705,3931.31 3688,3914.31 3688,3439.21 3713.82,3413.39 4839.69,3413.39 4918.13,3334.95 4918.13,2974.39 4866.15,2922.41 U21.102@4543.34,2922.41
  Bottom Layer w10: v1(3420.1,3919.74) 3420.1,3954.1 3433,3967 3697,3967 3705,3959 v1(3705,3935)
MCU_TX: U21.101 U23.1 | length 3071.2
  Top Layer w10: U23.1@3339.26,3919.74 v1(3371,3919.74) ; v1(3731.81,3900) 3730.46,3900 3705,3874.54 3705,3446.25 3720.86,3430.39 4848.15,3430.39 4936.13,3342.41 4936.13,2966.93 4871.92,2902.73 U21.101@4543.34,2902.73
  Bottom Layer w10: v1(3371,3919.74) 3371,3976 3385,3990 3718,3990 3731.81,3976.19 v1(3731.81,3900)
MEM_CNTRL: Q3.1 R4.1 U21.3 | length 3598.3
  Top Layer w10: v1(3615.36,3001.15) U21.3@3702.4,3001.15
  Bottom Layer w10: v1(580.94,3368) 611.59,3368 625,3354.59 625,2945.89 672.89,2898 3228.05,2898 3331.2,3001.15 v1(3615.36,3001.15)
MEM_SAVER: J7.2 Q3.3
MISO_NFC: J24.2 U21.134 | length 1587.9
  Top Layer w10: U21.134@3975.23,3116.51 v1(3975.23,3251.19)
  Bottom Layer w10: v1(3975.23,3251.19) 3976.2,3252.16 5189.59,3252.16 5207.87,3270.44 J24.2@5207.87,3483.03
MOSI_NFC: J24.3 U21.135 | length 1530.9
  Top Layer w10: v1(3929,3223) 3929,3202 3955.54,3175.46 U21.135@3955.54,3116.51
  Bottom Layer w10: v1(3929,3223) 3929,3251 3956,3278 5091.37,3278 5107.87,3294.5 J24.3@5107.87,3483.03
NetC8_2: C8.2 C13.2 C14.2 C15.2 C28.2 C92.2 FB1.1 U25.55 U25.56 U25.57
NetC20_2: C20.2 U3.3
NetC41_2: C41.2 C57.2 D14.3 R119.1 U18.6 | length 1122.1
  Top Layer w15: R119.1@2067.75,820.67 2067.75,886.15 2080.27,898.67 C57.2@2132.75,898.67
  Top Layer w40: D14.3@1929.97,896.44 1929.97,925.97 1976.11,972.11 1979.19,972.11 2023.54,1016.47 2579.02,1016.47 2638,957.49 2638,776.2 2633.97,772.17
NetC42_1: C42.1 R110.2 R111.2
NetC54_1: C54.1 C70.1 D31.1 U28.1
NetC75_1: C75.1 L3.1 U30.5
NetC75_2: C75.2 U30.6 | length 55.9
  Top Layer w12: U30.6@4137.75,504.74 4141.94,504.74 U30.6@4147.75,510.55
  Top Layer w15: U30.6@4147.75,510.55 C75.2@4147.75,554
NetC79_2: C79.2 R114.1 R115.2
NetC80_1: C80.1 D15.1 U19.12 | length 167.2
  Top Layer w10: U19.12@2315.54,712.36 2315.54,752.76 2334.32,771.53 C80.1@2383.87,771.53 C80.1@2384.5,770.91 ; D15.1@2384.5,721.99 D15.1@2385.12,721.36
  Top Layer w15: D15.1@2384.5,721.99 C80.1@2384.5,770.91
NetC81_2: C81.2 R119.2 U19.1
NetC82_1: C82.1 D15.2 R121.2 | length 104.1
  Top Layer w20: R121.2@2432.75,763.17 2432.56,762.98 2432.56,721.55 D15.2@2432.37,721.36 2432.37,667.37 2435.75,664 C82.1@2435.75,660.67
NetC87_1: C87.1 L5.2 R120.2 U19.10 | length 804.1
  Top Layer w10: U19.10@2315.54,672.99 2367.82,672.99 2433.3,607.51 2438.3,607.51 2456.5,589.31 2821.91,589.31 2846.93,614.33 2846.93,719.75 2832,734.67 R120.2@2730.79,734.67
  other v2: 2778.26,528.51 2808.29,528.51 2838.32,528.51 2868.35,528.51 2710,628 2744,628 2778,628 2710,654 2744,654 2778,654
NetC96_1: C96.1 U25.90 | length 779.9
  Top Layer w20: U25.90@1943.82,4241.74 2000.59,4241.74 ccw(c2000.59,4277.02) 2014.37,4244.54 ccw(c2000.59,4277.02) 2033.06,4263.23 ccw(c2000.59,4277.02) 2035.87,4277.02 2035.87,4398.49 cw(c2077.5,4398.49) 2077.5,4440.13 2477.87,4440.13 ccw(c2477.87,4470.39) 2508.13,4470.39 C96.1@2508.13,4503.29
NetC115_1: C115.1 C116.2 L7.1 R136.2 U5.5 | length 466.1
  Top Layer w20: 2044.33,2268.45 2044.33,2367.27 2044.33,2156.22 2073.83,2126.72 R136.2@2188.33,2126.72
NetC122_2: C122.2 R136.1 R164.2 U5.9 | length 86.1
  Top Layer w7: R164.2@2297.88,2207.99 2297.88,2251.06 2310.26,2263.44 U5.9@2335.8,2263.44
NetC126_1: C126.1 C127.2 D28.1 D29.1 D30.1 U27.3
NetD1_1: D1.1 L2.1 U3.2
NetD5_2: D5.2 F2.1 R63.2 | length 154.1
  Top Layer w7: F2.1@4857.92,4090.24 4870.81,4090.24 4887,4074.05 4887,3982.37 4870.67,3966.03 R63.2@4867.17,3966.03
NetD6_2: D6.2 D7.2
NetD8_2: D8.2 F3.1 R87.2 | length 152.9
  Top Layer w7: R87.2@4925.54,3966.03 4922.04,3966.03 4909.07,3979 4909.07,4075.55 4923.76,4090.24 F3.1@4937.54,4090.24
NetD17_2: D17.2 F1.2 J28.1
NetJ14_1: J14.1 SB5.2
NetJ14_2: J14.2 SB35.2 SB36.2
NetJ20_2: J20.2 R21.1
NetL6_1: L6.1 R143.2
NetL7_2: L7.2 U5.6 U5.7 U5.8
NetLED1_2: LED1.2 R14.2 | length 73.7
  Top Layer w12: R14.2@4912.36,2435.03 R14.2@4912.79,2434.6 ; LED1.2@4985.23,2434.6 LED1.2@4985.66,2434.16
  Top Layer w20: R14.2@4912.79,2434.6 LED1.2@4985.23,2434.6
NetLED2_2: LED2.2 R15.2 | length 72.9
  Top Layer w12: R15.2@4912.86,2386.27 R15.2@4912.94,2386.18 ; LED2.2@4985.58,2386.18 LED2.2@4985.66,2386.1
  Top Layer w20: R15.2@4912.94,2386.18 LED2.2@4985.58,2386.18
NetLED3_2: LED3.2 R17.2 | length 73
  Top Layer w10: R17.2@4912.86,2337.5 R17.2@4913.39,2338.03
  Top Layer w20: R17.2@4913.39,2338.03 LED3.2@4985.66,2338.03
NetLED4_1: LED4.1 R50.1
NetLED5_1: LED5.1 R51.1
NetLED6_1: LED6.1 R93.1
NetLED7_1: LED7.1 R94.1
NetLED8_2: LED8.2 R53.2 SB3.1 | length 96.3
  Top Layer w30: SB3.1@7477.87,4628.03 7479.51,4626.4 LED8.2@7525.45,4626.4 ; R53.2@7525.38,4572.53 LED8.2@7525.38,4620.55
NetLED9_1: LED9.1 R126.1 | length 59.5
  Top Layer w20: LED9.1@1794.4,192.03 R126.1@1853.87,192.03
NetLED9_2: LED9.2 U19.3 | length 968.1
  Top Layer w8: v2(2133.25,640.7) 2133.25,665.32 2140.91,672.99 U19.3@2177.75,672.99
  Top Layer w15: LED9.2@1735.34,192.03 1704.87,192.03 1690.87,206.03 1690.87,364.03 1731.5,404.67 v2(1937.9,404.67)
  Bottom Layer w15: v2(1937.9,404.67) 2120.12,404.67 2133.25,417.79 v2(2133.25,640.7)
NetLED10_1: LED10.1 R128.1 | length 81.3
  Top Layer w20: LED10.1@1772.57,255.03 R128.1@1853.87,255.03
NetLED10_2: LED10.2 U19.5 | length 769
  Top Layer w7: v2(2216.97,582.06) v2@2217.05,582.13 ; U19.5@2217.05,613.86 U19.5@2217.12,613.93
  Top Layer w15: LED10.2@1735.17,255.03 1735.17,351.7 1758.42,374.95 v2(1909.69,374.95)
  Bottom Layer w15: v2(1909.69,374.95) 1910.1,375.36 2131.45,375.36 2161.67,405.58 2161.67,567.62 2176.11,582.06 v2(2216.97,582.06)
NetLED11_1: LED11.1 R132.1
NetLED12_1: LED12.1 R137.1
NetLED12_2: LED12.2 Q40.3 | length 148.4
  Top Layer w15: Q40.3@2652.6,3062.13 2741.4,3062.13 2754.53,3049 LED12.2@2754.53,3008
NetLED13_1: LED13.1 R145.1
NetLED13_2: LED13.2 Q22.3 | length 457
  Top Layer w15: Q22.3@2491.84,3062.13 2491.84,2920.87 2514.71,2898 2737.53,2898 2754.53,2915 LED13.2@2754.53,2951.5
NETLIGHT: R141.1 U25.52 | length 644.1
  Top Layer w10: v1(2794,3533) v1@2794.04,3533.04 ; U25.52@2888.67,3533.04 U25.52@2888.7,3533.07
  Top Layer w15: v1@2794.04,3533.04 U25.52@2888.67,3533.04
  Bottom Layer w15: v2(2563.49,3237) 2600.19,3200.3 2744.39,3200.3 2794,3249.91 v1(2794,3533)
NetLS1_2: LS1.2 Q19.3
NetQ5_1: Q5.1 R24.1
NetQ6_1: Q6.1 R25.1
NetQ7_1: Q7.1 R27.1 R29.1 | length 120.8
  Top Layer w15: R27.1@5067.64,920.03 5123.87,920.03 5137.87,906.03 R29.1@5137.87,861.31
NetQ9_1: Q9.1 R42.1
NetQ10_1: Q10.1 R44.1
NetQ11_1: Q11.1 R46.1
NetQ11_3: Q11.3 R42.2 R43.1
NetQ12_1: Q12.1 R47.1
NetQ12_3: Q12.3 R44.2 R45.1
NetQ13_1: Q13.1 R52.1
NetQ14_1: Q14.1 R56.1
NetQ15_1: Q15.1 R89.2 | length 224.2
  Top Layer w15: Q15.1@5481.27,773.62 5530.1,773.62 5545.28,758.45 5545.28,657.61 5531.7,644.03 R89.2@5497.87,644.03
NetQ16_1: Q16.1 R90.2 | length 236.9
  Top Layer w15: Q16.1@4794.27,773.62 4848.83,773.62 4865.48,756.97 4865.48,658.94 4850.58,644.03 R90.2@4810.87,644.03
NetQ17_1: Q17.1 R95.1 R97.1
NetQ17_3: Q17.3 R52.2 R86.2 | length 333.1
  Bottom Layer w20: v2(4672.32,1717.03) 4723.87,1717.03 4744.87,1696.03 v2(4744.87,1444.19)
NetQ18_1: Q18.1 R28.2
NetQ18_3: Q18.3 R29.2
NetQ19_1: Q19.1 R62.1
NetQ21_1: Q21.1 R68.1 R107.1 | length 120.8
  Top Layer w15: R68.1@5751.64,920.03 5807.87,920.03 5821.87,906.03 R107.1@5821.87,861.31
NetQ22_1: Q22.1 R141.2 R142.2
NetQ23_1: Q23.1 R154.2 R155.2
NetQ24_1: Q24.1 R96.1 R98.1
NetQ24_3: Q24.3 R56.2 R88.2 | length 327.7
  Bottom Layer w20: v2(5397.06,1717.03) 5442,1717.03 5465.87,1693.17 v2(5465.87,1444.19)
NetQ26_3: Q26.3 R74.2 R75.1 | length 133.2
  Top Layer w15: R75.1@3872,199 R74.2@3955,199 Q26.3@3955,249.25
NetQ29_1: Q29.1 R99.2 | length 213.5
  Top Layer w15: Q29.1@5485.27,1167.62 5524.31,1167.62 5536.87,1155.07 5536.87,1054.03 5520.87,1038.03 R99.2@5487.87,1038.03
NetQ30_1: Q30.1 R100.2 | length 213.5
  Top Layer w15: Q30.1@4794.27,1167.62 4833.31,1167.62 4845.87,1155.07 4845.87,1054.03 4829.87,1038.03 R100.2@4796.87,1038.03
NetQ31_1: Q31.1 R33.2
NetQ31_3: Q31.3 R107.2
NetQ32_1: Q32.1 Q33.3 R71.2
NetQ33_1: Q33.1 R81.2
NetQ38_1: Q38.1 R22.1
NetQ39_3: Q39.3 R123.1 R125.2 U19.2 | length 165.1
  Top Layer w8: 2150.62,692.74 U19.2@2177.68,692.74
  Top Layer w15: R123.1@2028.87,653.53 2071.87,653.53 2111.07,692.74 2150.62,692.74
NetQ40_1: Q40.1 R138.2 R139.2
NetQ43_1: Q43.1 R146.1 R147.2
NetR5_1: R5.1 U1.7
NetR8_1: R8.1 U2.7
NetR16_2: R16.2 SW4.2
NetR37_1: R37.1 U14.1 | length 240.8
  Top Layer w20: R37.1@7167.84,1889.82 7111.87,1889.82 7096.87,1874.82 7096.87,1792.03 7109.98,1778.92 U14.1@7172.25,1778.92
NetR39_1: R39.1 U15.1 | length 240.8
  Top Layer w20: R39.1@7168.05,2572.49 7112.08,2572.49 7097.08,2557.49 7097.08,2474.7 7110.19,2461.59 U15.1@7172.46,2461.59
NetR54_2: R54.2 U29.3
NetR61_1: R61.1 R63.1 R108.1 U24.7
NetR78_1: R78.1 U8.1 | length 240.8
  Top Layer w20: R78.1@7167.84,1208.82 7111.87,1208.82 7096.87,1193.82 7096.87,1111.03 7109.98,1097.92 U8.1@7172.25,1097.92
NetR80_1: R80.1 U9.1
NetR87_1: R87.1 R106.2 R108.2 U24.6
NetR109_1: R109.1 R165.2 U5.11 | length 55.4
  Top Layer w7: 2375.17,2208 U5.11@2375.17,2263.44
NetR111_1: R111.1 SB37.1
NetR112_2: R112.2 R113.2 R114.2
NetR115_1: R115.1 SB38.1
NetR116_1: R116.1 U17.2 | length 120.4
  Top Layer w22: R116.1@6956.05,4607.62 6956.69,4607.62 7040.92,4523.4 U17.2@7041.56,4523.4
NetR121_1: R121.1 U19.16 | length 322.8
  Top Layer w7: R121.1@2432.44,809.48 R121.1@2432.75,809.17
  Top Layer w8: v2(2204.52,800.67) 2204.52,800.58 2216.92,788.18 U19.16@2216.92,751.92
  Top Layer w15: R121.1@2432.44,809.48 v2(2432.44,835.54)
  Bottom Layer w20: v2(2204.52,800.67) 2239.39,835.54 v2(2432.44,835.54)
NetR122_1: R122.1 R124.1 R168.2 U19.4
NetR127_1: R127.1 R129.2 U19.8
NetR134_1: R134.1 U25.98 | length 2585.7
  Top Layer w10: U25.98@2888.7,4202.37 2808.17,4202.37 2794.9,4189.09 2794.9,4081.5 2784.34,4070.94 2657.86,4070.94 2640.24,4053.33 2640.24,3474.44 2652.48,3462.21 2785.07,3462.21 2800,3447.28 2800,2838.95 2836.82,2802.13 3576.23,2802.13 3596.86,2822.75 R134.1@3596.86,2856.36
NetR135_1: R135.1 U25.96
NetR140_1: R140.1 U25.95
NetR163_1: R163.1 U5.4 | length 66.9
  Top Layer w7: R163.1@2304.34,2430 2306.84,2430 2335.8,2401.04 U5.4@2335.8,2377.61
NetR164_1: R164.1 R166.2 U5.10 | length 152
  Top Layer w7: R164.1@2294.88,2147.99 2297.38,2147.99 2326.41,2177.02 2326.41,2228.58 2334.31,2236.49 2351.38,2236.49 2355.49,2240.59 U5.10@2355.49,2263.44
NetR167_2: R167.2 U5.12 | length 109.4
  Top Layer w7: U5.12@2394.86,2263.44 2394.86,2243.68 2398.96,2239.58 2449.47,2239.58 2453.57,2235.48 R167.2@2453.57,2208
NetSB7_1: SB7.1 U7.5 | length 3.2
  Top Layer w10: SB7.1@1454.75,435.63 SB7.1@1456.98,433.4
NetU18_2: U18.2 U19.15 | length 607.1
  Top Layer w10: U19.15@2236.8,751.73 2236.98,751.9 2236.98,908.64 2274.49,946.16 2538.94,946.16 2565.75,919.34 U18.2@2565.75,824.67
NetU18_4: U18.4 U19.13 | length 391.7
  Top Layer w10: U19.13@2276.17,751.73 2276.17,853.77 2294.44,872.03 v2(2448.87,872.03) ; v2(2507.69,872.03) 2507.69,868.35 2515.57,860.47 U18.4@2515.57,824.67
  Bottom Layer w20: v2(2448.87,872.03) v2(2507.69,872.03)
NRST: C73.2 J1.10 SW3.3 U21.25 | length 5195.4
  Top Layer w10: U21.25@3702.4,2568.08 3866.6,2568.08 3899,2600.49 v1(3899,2908) ; J1.10@4353.87,3606.03 4298.41,3606.03 4281.29,3623.15 4281.29,3927.23 4394,4039.93 4394,4348.82 4435.76,4390.58 6639.42,4390.58 6685.4,4344.6 SW3.3@6685.4,4088.44
  Top Layer w20: v2(4353.87,3511.85) J1.10@4353.87,3606.03
  Bottom Layer w10: v1(3899,2908) 3861.78,2908 3843.85,2925.93 3843.85,3493.5 3862.19,3511.85 v2(4353.87,3511.85)
OSC_IN: C53.2 U21.8 X3.1 | length 240.8
  Top Layer w7: X3.1@3501.22,2941.31 3533.58,2941.31 3549.77,2925.12 3549.77,2911.57 3558.61,2902.73 U21.8@3702.4,2902.73 ; X3.1@3524,2941.31 X3.1@3539.75,2941.31
OSC_OUT: C78.2 U21.9 X3.2 | length 219.5
  Top Layer w7: X3.2@3524,2842.88 X3.2@3539.75,2842.88 ; X3.2@3524.59,2842.88 3534.48,2842.88 3550.67,2859.07 3550.67,2874.88 3558.83,2883.04 U21.9@3702.4,2883.04
OV_UV_EN: R81.1 R82.2 R117.1 R118.1 | length 376.2
  Top Layer w25: v2(782.02,563.98) R81.1@811.04,563.96 ; R117.1@909.82,563.96 v2(951.87,563.96) R118.1@1012.18,563.96 R82.2@1087.14,563.96
  Bottom Layer w20: v2(782.02,563.98) v2(951.87,563.96)
PGND: C115.2 C116.1 C117.1 C118.1 C119.1 C120.1 C121.1 NT1.1 U5.15 U5.16
  other v2: 2854.19,2343.53 2887.69,2343.53 2921.19,2343.53 2854.19,2376.53 2887.69,2376.53 2921.19,2376.53 2168.67,2533.34 2227,2533.34 2168.67,2605.67 2227,2605.67 2168.67,2678 2227,2678
PH: C82.2 L5.1 U18.1 U18.5 U19.14 | length 564.1
  Top Layer w10: U19.14@2256.49,751.73 2256.49,889.45 2274.66,907.62 2460.91,907.62 2478.82,889.7 v2(2478.82,825.3)
  Bottom Layer w20: v2@2478.78,825.26 2563.95,825.26 v2@2591.86,853.17
  other v2: 2504.25,528.51 2534.28,528.51 2564.31,528.51 2594.34,528.51 2541.16,628 2567.16,628 2541.16,654 2567.16,654 2592.56,853.87
PIR_OUT: R116.2 U21.99 | length 4127.2
  Top Layer w10: U21.99@4543.34,2863.36 4621.95,2863.36 4717.7,2767.61 4764.74,2767.61 5560.33,2767.61 5617.04,2824.32 5617.04,3846.27 5636.28,3865.51 6777.91,3865.51 6818.98,3906.58 6818.98,4545.15 6839.03,4565.2 R116.2@6913.63,4565.2
PM_CNTRL: Q4.1 R6.1 U21.2 | length 4085
  Top Layer w10: v1(3654.25,3027.96) 3657.93,3027.96 3664.55,3021.35 3701.88,3021.35 U21.2@3702.4,3020.84
  Bottom Layer w10: v1(577.94,3858) 627.81,3858 643,3842.81 643,2954.75 682.75,2915 3221.01,2915 3333.97,3027.96 v1(3654.25,3027.96)
PROP_MIXING: J8.2 Q4.3
PS_MCU: SB37.2 SB38.2 U21.80 | length 5208.2
  Top Layer w10: U21.80@4543.34,2489.34 4706.58,2489.34 4827.37,2610.13 4912.79,2610.13 7004,2610.13 7044.87,2569.26 7044.87,860.46 7029.44,845.03 SB38.2@6600.87,845.03
  Top Layer w15: SB37.2@6166.74,791.03 6166.74,831.96 6179.81,845.03 SB38.2@6600.87,845.03
PS_PWR: J20.1 SB43.2 SB44.2
PSW_MCU: C40.1 D12.1 J20.3 R22.2 R66.2
PWM_D2: Q38.3 R20.1 U21.81 | length 4481.3
  Top Layer w10: U21.81@4543.34,2509.03 4702.23,2509.03 4823.01,2629.81 4927.36,2629.81 7011.18,2629.81 7063.87,2577.13 7063.87,858.57 7077.4,845.03 R20.1@7228.64,845.03
PWRKEY: C102.2 D19.1 Q43.3 U25.1 | length 1759.8
  Top Layer w20: U25.1@2731.22,4320.48 v1@2731.23,4366.3
  Bottom Layer w15: v1(2731.25,4366.31) 2732.64,4364.92 2859.4,4364.92 2879.38,4344.94 2879.38,3436.94 2905.54,3410.78 v1(3517.53,3410.78)
RE/DE/RS485/T: R58.1 R59.1 U21.88 U24.2 U24.3 | length 2434.6
  Top Layer w10: U21.88@4543.34,2646.82 4543.66,2646.51 4593.35,2646.51 v1(4593.67,2646.19) ; v2@5144,3784.9 v2(5143.87,3785.03) 5143.87,3593.95 5153,3584.81 5483.23,3584.81 5522,3546.04 5522,2928.73 5495.27,2902 v1(5172,2902)
  Bottom Layer w10: v1(4593.67,2646.19) 4594.3,2646.82 5042.34,2646.82 5056.94,2661.43 5056.94,2886.96 5071.98,2902 v1(5172,2902)
READY: R161.1 U5.3 U21.125 | length 2451.4
  Top Layer w7: U5.3@2355.49,2377.61 R161.1@2355.49,2429.48 ; R161.1@2355.49,2430 2356.99,2431.5 2537.5,2431.5 2568.57,2462.57 v2(2568.57,2623.31) ; v2(3901.79,2565.36) 4152.4,2815.97 U21.125@4152.4,3116.51
  Bottom Layer w7: v2(2568.57,2623.31) 3707.29,2623.31 3765.24,2565.36 v2(3901.79,2565.36)
RESIN_SAVER: J9.2 Q8.3
RF_ANT: D9.2 J25.1 U25.60 | length 895.4
  Top Layer w20: U25.60@2888.7,3848.03 2987.87,3848.03 ccw(c2987.87,3878.15) 3017.98,3878.15 J25.1@3017.98,4627.04
RS485/RS232/T.RXD/RS485/RS232/T: R57.1 U21.87 U24.1 | length 2479.6
  Top Layer w10: v1(4476,2603) 4500.14,2627.14 U21.87@4543.34,2627.14 ; v1(5172,2860) 5197,2885 5506.22,2885 5539,2917.78 5539,3553.08 5490.27,3601.81 5207.87,3601.81 5200.37,3609.31 v2(5200.37,3694.53) v2@5201.16,3693.75
  Bottom Layer w10: v1(4476,2603) 4491.21,2618.21 5069.78,2618.21 5083.74,2632.17 5083.74,2846.02 5097.72,2860 v1(5172,2860)
RS485/RS232/T.TXD/RS485/RS232/T: R60.1 U21.89 U24.4 | length 2697.9
  Top Layer w10: v1(4476,2692) 4501.49,2666.51 U21.89@4543.34,2666.51 ; v2@5110,3886.9 v2(5109.87,3887.03) 5109.87,3592.63 5134.69,3567.81 5476.19,3567.81 5505,3539 5505,2940.25 5483.75,2919 5197,2919 v1(5172,2944)
  Bottom Layer w10: v1(4476,2692) 4495,2673 5020.37,2673 5033.49,2686.12 5033.49,2926.93 5050.56,2944 v1(5172,2944)
RS485_N: F2.2 J29.2 | length 209.3
  Top Layer w7: J29.2@4796.87,4298.03 4810.46,4284.44 4866.42,4284.44 4885.87,4265 4885.87,4193.03 4869.68,4176.85 F2.2@4857.92,4176.85
RS485_P: F3.2 J29.3 | length 211
  Top Layer w7: F3.2@4937.54,4176.85 4924.05,4176.85 4907.87,4193.03 4907.87,4265 4927.31,4284.44 4983.28,4284.44 J29.3@4996.87,4298.03
RS_CNTRL: Q8.1 R9.1 U21.1 | length 4667
  Top Layer w10: U21.1@3702.4,3040.52 v1(3749,3040.52)
  Bottom Layer w10: v1(576.94,4346) 646.87,4346 661,4331.87 661,2962.2 691.2,2932 3213.97,2932 3340.97,3059 3729.56,3059 3748.04,3040.52 v1(3749,3040.52)
RST_GSM: C97.2 D16.1 Q23.3 U25.16 | length 1971.9
  Top Layer w20: U25.16@2140.67,4320.48 2140.67,4251.46 2193,4199.13 2193,4093 2213,4073 v1(2584,4073)
  Bottom Layer w15: v1(2584,4073) 2672.66,4073 2732.66,4133 2832.38,4133 2857.38,4108 2857.38,3422.88 2900.5,3379.76 v1(3169.32,3379.76)
RX: U16.3 U21.116 | length 2451.3
  Top Layer w7: U21.116@4329.56,3116.51 4329.88,3116.82 4329.88,3164.65 v2(4347.81,3182.58)
  Top Layer w20: U16.3@6408.7,3060 v1(6455,3060)
  GND w8: v2(4347.81,3182.58) 4407.64,3242.41 6455.69,3242.41 6475,3223.1 6475,3080 v1(6455,3060)
RX#: R105.1 U16.1 U28.4 | length 593.1
  Top Layer w10: U28.4@6253.18,3442.69 6476.95,3442.69 6498.07,3421.57 6498.07,3179.53 6478.53,3160 U16.1@6408.7,3160
RXIN1: R91.2 R101.1 U21.70 | length 1125.5
  Top Layer w10: v1(4349,2044) 4389,2044 4417.59,2072.59 4417.59,2220.24 4427.99,2230.64 U21.70@4427.99,2275.56
  Bottom Layer w10: v1(4349,2044) 4396.37,2044 4440.82,1999.55 4440.82,1887.78 4531.77,1796.83 4531.77,1482.06 4569.64,1444.19 v2(4688.47,1444.19)
RXIN1#: Q13.3 R48.1 R100.1 R101.2 | length 1061.7
  Top Layer w15: R48.1@4623.4,1534.32 4660.87,1534.32 ; R48.1@4629.87,1534.03 4592.4,1534.03 4578.87,1520.51 4578.87,1283.15 4596.98,1265.03 4858.87,1265.03 4874.87,1249.03 4874.87,995.03 4857.87,978.03 R100.1@4796.87,978.03 ; R101.2@4688.47,1534.03 4717.87,1534.03 4725.87,1542.03 Q13.3@4725.87,1582.43
RXIN2: R92.2 R102.1 U21.112 | length 2582.4
  Top Layer w10: v1(4408.3,3059.02) U21.112@4408.3,3116.51
  Top Layer w20: v2(5376.21,1474.03) R102.1@5408.87,1474.03
  Bottom Layer w10: v1@4408.3,3057.3 4389.3,3076.3 4330.98,3076.3 4288.16,3033.49 4288.16,2496.76 4492.83,2292.09 4492.83,1916.33 4551.27,1857.89 4957.99,1857.89 5008.87,1807.01 5008.87,1673.83 5208.67,1474.03 v2(5376.21,1474.03)
RXIN2#: Q14.3 R49.1 R99.1 R102.2 | length 992
  Top Layer w15: R49.1@5351.87,1534.32 5314.4,1534.32 5300.87,1520.79 5300.87,1285.81 5321.64,1265.03 5549.87,1265.03 5565.87,1249.03 5565.87,995.03 5548.87,978.03 R99.1@5487.87,978.03 ; R102.2@5413.21,1534.03 5442.61,1534.03 5450.61,1542.03 Q14.3@5450.61,1582.43
S_VIN: D14.1 D14.2 J21.1 R123.2 R126.2 R128.2 | length 212.6
  Top Layer w20: v2(1839.87,343.03) 1840.07,343.24 1892.23,343.24 1913.87,321.61 R128.2@1913.87,255.03 R126.2@1913.87,192.03
  other v2: 1797,648 1832,648 1797,679 1832,679
SCK_NFC: J24.1 U21.133 | length 1687
  Top Layer w10: U21.133@3994.91,3116.51 3994.91,3221.35 4009.78,3236.22 4009.78,3236.47 4022.89,3249.57 4057.78,3249.57 v1(4082,3225.35)
  Bottom Layer w10: v1(4082,3225.35) 5290.23,3225.35 5307.87,3242.98 J24.1@5307.87,3483.03
SET: U21.118 U28.5 | length 2879.2
  Top Layer w7: v2(4290.19,3073.43) U21.118@4290.19,3116.51
  Top Layer w15: U28.5@6253.18,3342.69 6233.5,3323.01 6233.5,2770.1 6257.79,2745.81 v2(6305,2745.81)
  GND w8: v2(4290.19,3073.43) 4318.29,3101.53 4872.86,3101.53 4908.85,3065.54 5407.48,3065.54 5727.21,2745.81 v2(6305,2745.81)